# Altium PCB Base.PcbDoc
Units mil, origin at the board's own origin, x right, y up, seen from the top; angles counter-clockwise.
Board outline 2790.03 x 2970.03 mil, 2 copper layers (Top Layer, Bottom Layer); 89 components, 74 nets, 301 pads, 22 vias.
Unrouted connection lines stored in the file: 1.
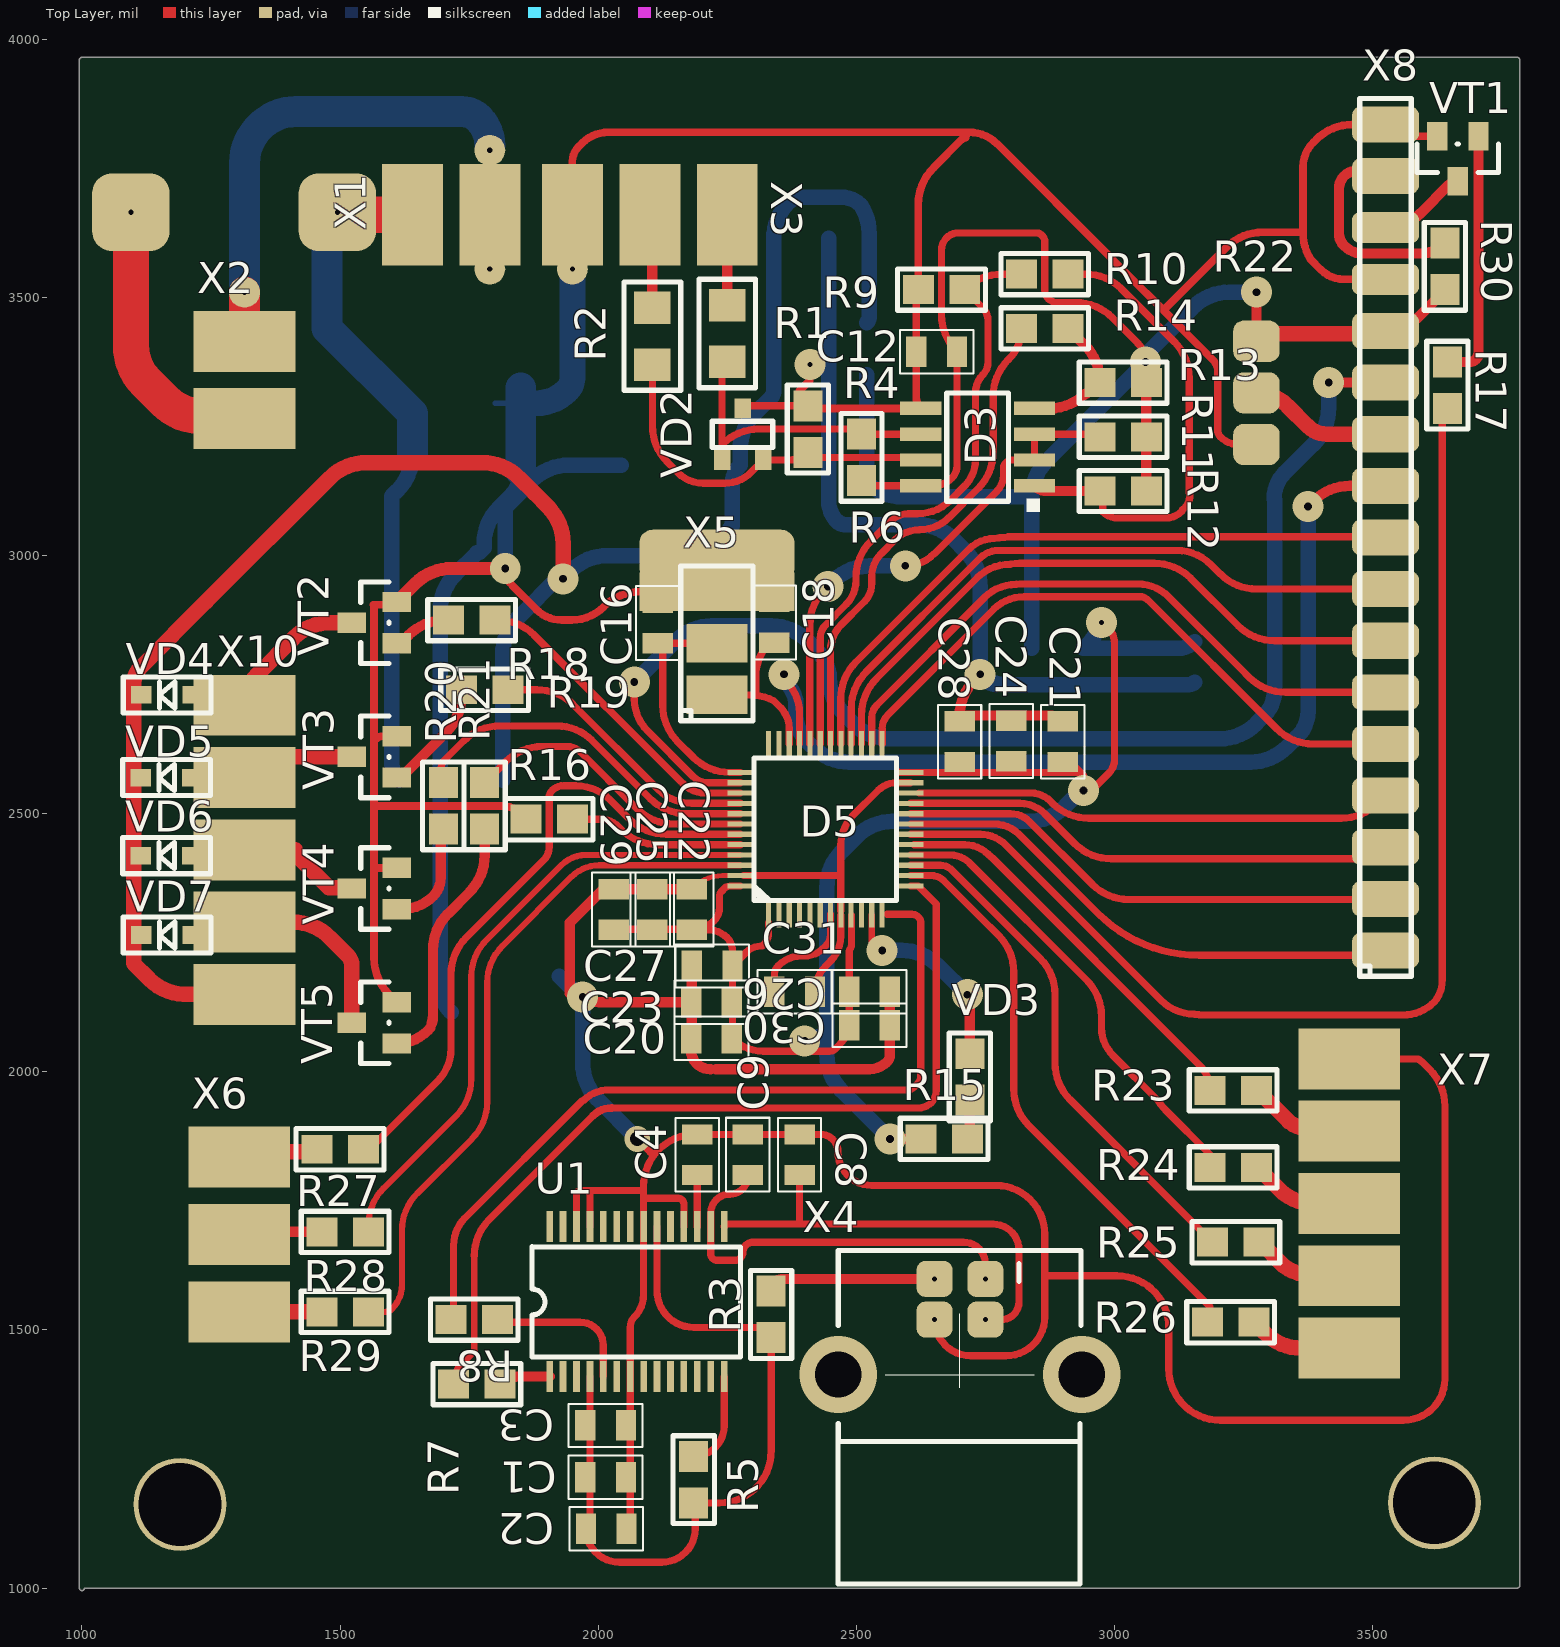
[diagram p0: Top Layer view]
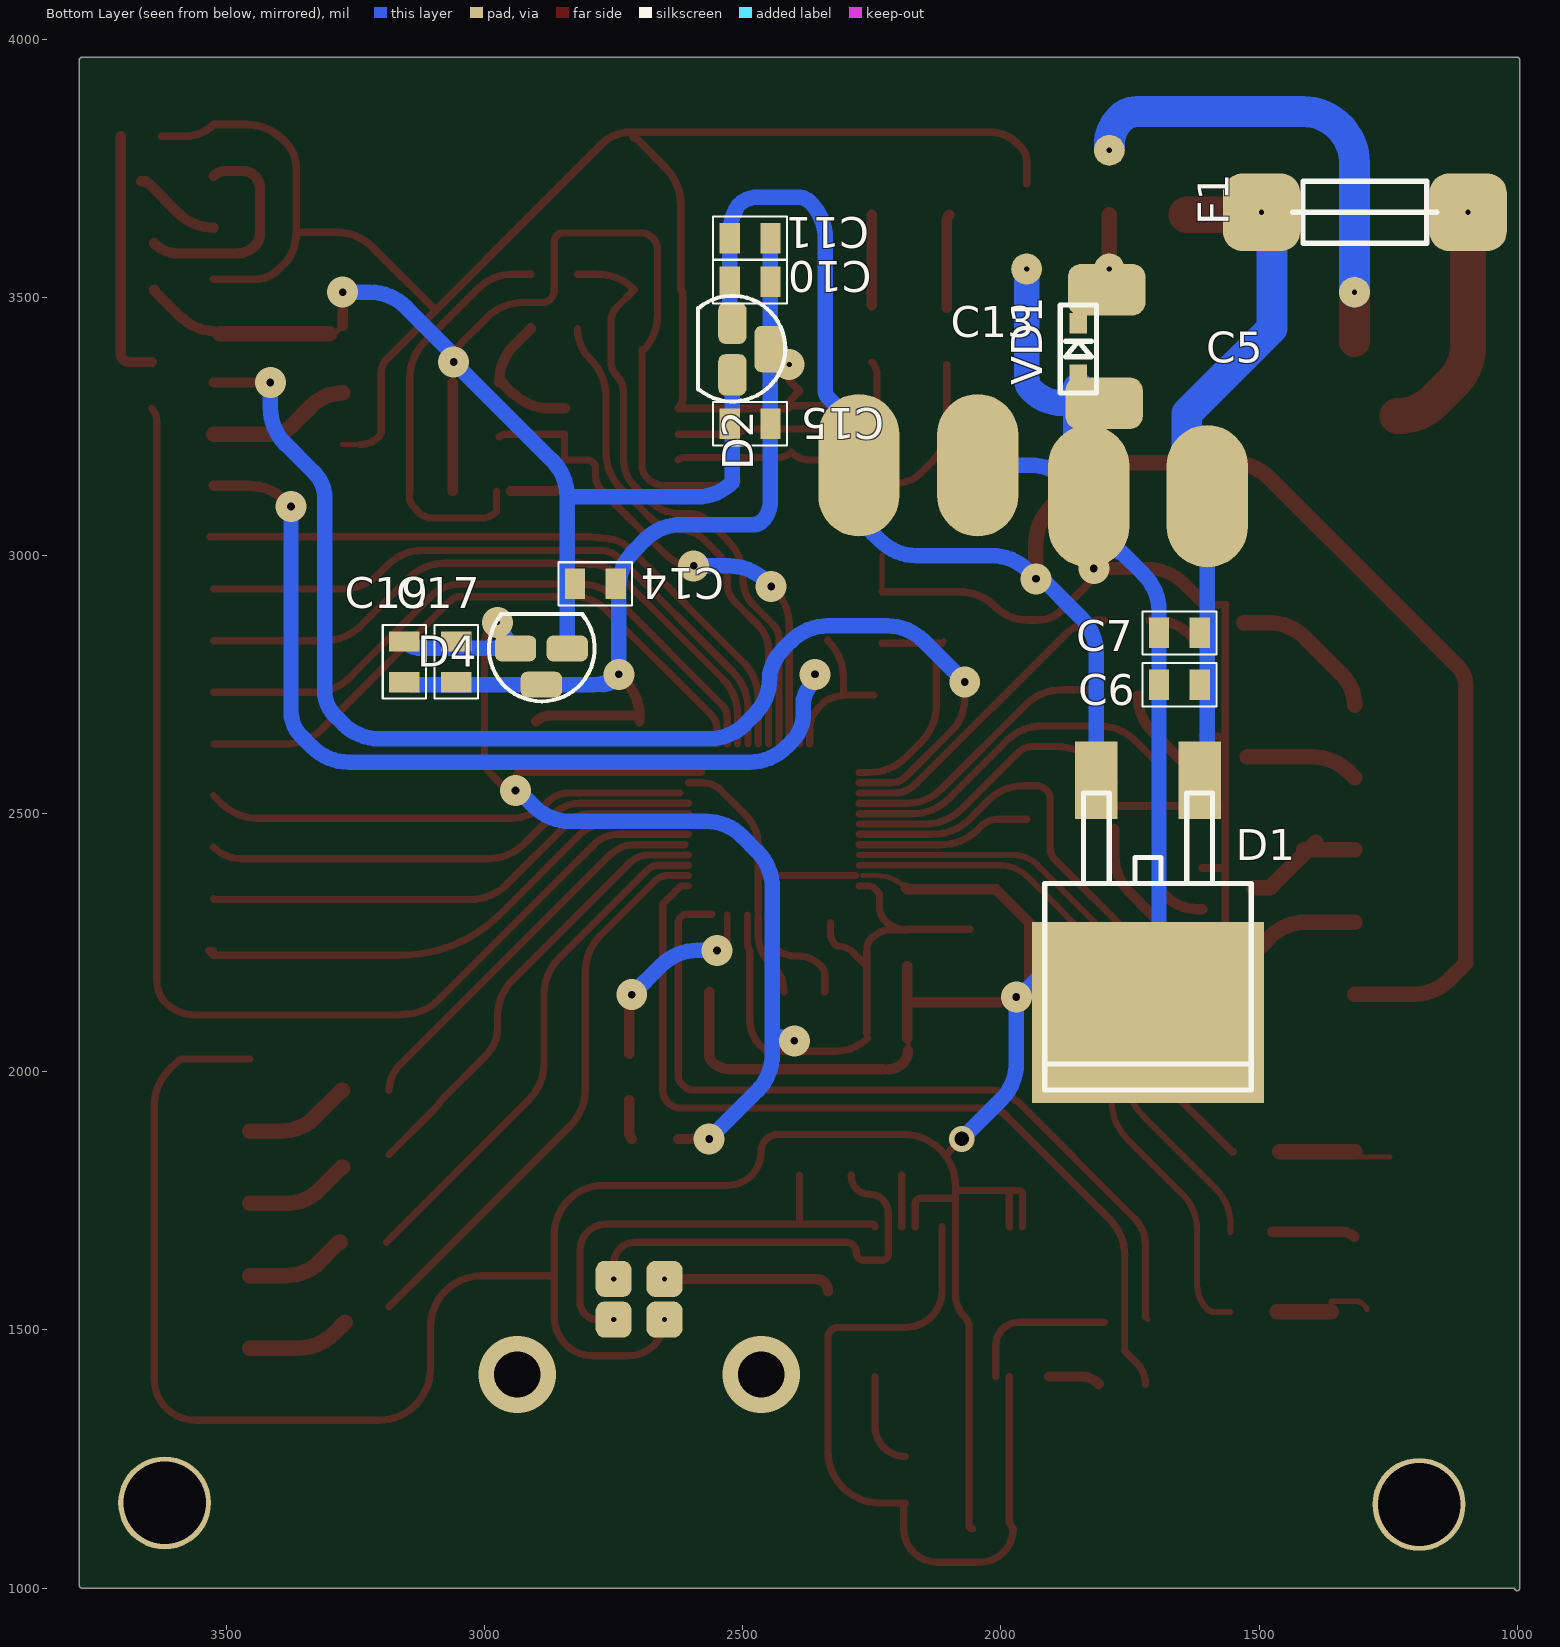
[diagram p1: Bottom Layer view, seen from below]

## Layer stack, top to bottom
Top Solder: solder mask 0.4, Solder Resist, Dk 3.5
Top Layer: signal copper 1.4
Dielectric 1: dielectric 12.6, FR-4, Dk 4.8
Bottom Layer: signal copper 1.4
Bottom Solder: solder mask 0.4, Solder Resist, Dk 3.5

## Board outline
994.99,1000 994.99,3960 cw(c1000,3960) 1000,3965.01 3780,3965.01 cw(c3780,3960) 3785.01,3960 3785.01,1005 cw(c3780,1005) 3780,999.99 1005.01,999.99 cw(c1000,1000)

## Design rules (kind name [scope] priority, off if disabled: settings)
Clearance [All] p1: gap=10 ignorepadtopadclearanceinfootprint=FALSE except(0: Arc-Hole Track-Hole SMDPad-Hole THPad-Hole Via-Hole Fill-Hole Poly-Hole Region-Hole Text-Hole)
PolygonConnect [All] p1: connectstyle=Relief reliefconductorwidth=10 reliefentries=4 polygonreliefangle="90 Angle" airgapwidth=10
RoutingVias [All] p1: holewidth=28 width=50 viastyle="Through Hole" minholewidth=28 minwidth=50 maxholewidth=28 maxwidth=50
SolderMaskExpansion [All] p1: expansion=4
Width [All] p1: maxlimit=10 minlimit=10 preferedwidth=10
30 further rules are at their usual default settings.

## Components (designator, comment, footprint, x,y, rotation, side; value= is the part's Value field where it differs from the comment)
C1 "CC0805" 0805T 2053.74,1215 r180 top value="10 нФ"
C2 "CC0805" 0805T 2055,1115 r180 top value="4,7 мкФ"
C3 "CC0805" 0805T 2053.74,1315 r180 top value="100 нФ"
C4 "CC0805" 0805T 2192,1878.74 r270 top value="100 нФ"
C5 "C-RAD-2_5-6_8" C_electrolit_smd_7mm 1580,3115 r0 bottom value={Value}
C6 "CC0805" 0805T 1693.74,2750 r180 bottom value=106
C7 "CC0805" 0805T 1693.74,2850 r180 bottom value=104
C8 "CC0805" 0805T 2390,1878.74 r270 top value="10 пФ"
C9 "CC0805" 0805T 2290,1800 r90 top value="0.1 пФ"
C10 "CC0805" 0805T 2446.26,3530 r0 bottom value=106
C11 "CC0805" 0805T 2446.26,3615 r0 bottom value=104
C12 "CC0805" 0805T 2616.26,3395 r0 top value=104
C13 "C-RAD-2_5-6_8" C_electrolit_smd_7mm 2295,3175 r180 bottom value={Value}
C14 "CC0805" 0805T 2746.26,2945 r0 bottom value=106
C15 "CC0805" 0805T 2446.26,3255 r0 bottom value=104
C16 "CC0805" 0805T 2115,2908.74 r270 top value=27p
C17 "CC0805" 0805T 3055,2754.75 r90 bottom value=104
C18 "CC0805" 0805T 2341.26,2910 r270 top value=27p
C19 "CC0805" 0805T 3155.27,2754.75 r90 bottom value=104
C20 "CC0805" 0805T 2180,2065 r0 top value=475
C21 "CC0805" 0805T 2900,2678.82 r270 top value=475
C22 "CC0805" 0805T 2181.34,2353.74 r270 top value=475
C23 "CC0805" 0805T 2180,2135 r0 top value=104
C24 "CC0805" 0805T 2800,2680 r270 top value=104
C25 "CC0805" 0805T 2105,2353.74 r270 top value=104
C26 "CC0805" 0805T 2565,2155 r180 top value=105
C27 "CC0805" 0805T 2181.26,2205 r0 top value=104
C28 "CC0805" 0805T 2700,2678.74 r270 top value=104
C29 "CC0805" 0805T 2030,2353.74 r270 top value=104
C30 "CC0805" 0805T 2565,2090 r180 top value=103
C31 "CC0805" 0805T 2420,2155 r180 top value=104
D1 "L78-D2PAK" D2PAK(IR) 1615,2565 r0 bottom value={Value}
D2 "L78-D2PAK" TO92-LM_TL431_TO93(Primary)#1 2520,3450 r270 bottom value=L7805
D3 "ST485D" SO8 2845,3135 r180 top
D4 "L78-D2PAK" TO92-LM_TL431_TO93(Primary)#2 2840,2820 r0 bottom value=L7805
D5 "STM32F030C8T6" LQFP48 2330,2305 r90 top
F1 "F" F 1095,3665 r0 bottom value={Value}
R1 "201" RC1206_IPC 2250,3430 r90 top value="1206    201"
R2 "201" RC1206_IPC 2105,3425 r90 top value="1206    201"
R3 "R0805MY" RC0805 2335,1575 r270 top value="1 Ом"
R4 "R0805MY" RC0805 2406.26,3290 r270 top value=10K
R5 "R0805MY" RC0805 2185,1165 r90 top value="10 КОм"
R6 "R0805MY" RC0805 2510,3235 r270 top value=10K
R7 "R0805MY" RC0805 1720,1395 r0 top value="5,1 кОм"
R8 "R0805MY" RC0805 1715,1520 r0 top value="1 кОм"
R9 "R0805MY" RC0805 2620,3515 r0 top value=33K
R10 "R0805MY" RC0805 2820,3545 r0 top value="20 K"
R11 "R0805MY" RC0805 3061.72,3230 r180 top value=10K
R12 "R0805MY" RC0805 3061.72,3125 r180 top value=10K
R13 "R0805MY" RC0805 3061.72,3335 r180 top value=10K
R14 "R0805MY" RC0805 2820,3440 r0 top value="1 K"
R15 "RC0805" RC0805 2625,1870 r0 top value=510
R16 "R0805MY" RC0805 1950,2489.29 r180 top value=10K
R17 "R0805MY" RC0805 3645,3375 r270 top value=100
R18 "R0805MY" RC0805 1710,2875 r0 top value=100
R19 "R0805MY" RC0805 1735,2740 r0 top value=100
R20 "R0805MY" RC0805 1700,2470 r90 top value=100
R21 "R0805MY" RC0805 1780,2470 r90 top value=100
R22 "3362R" "Resistor 3363R" 3255,3315 r270 top value={Value}
R23 "R0805MY" RC0805 3275,1964.14 r180 top value="1 K"
R24 "R0805MY" RC0805 3275,1815 r180 top value="1 K"
R25 "R0805MY" RC0805 3280,1670 r180 top value="1 K"
R26 "R0805MY" RC0805 3270,1515 r180 top value="1 K"
R27 "R0805MY" RC0805 1455,1850 r0 top value="1 K"
R28 "R0805MY" RC0805 1465,1690 r0 top value="1 K"
R29 "R0805MY" RC0805 1465,1535 r0 top value="1 K"
R30 "R0805MY" RC0805 3640,3605 r270 top value=100
U1 "FT232RL" SSOP_R28 1906,1410 r90 top
VD1 "DIOD_SOD232" 1N4148_LRG 1850,3350 r90 bottom
VD2 "CDSOT23-SM712" SOT-23A 2240,3185 r0 top
VD3 "KP-2012SURK" RC0805 2720,1945 r90 top
VD4 "DIOD_SOD232" 1N4148_LRG 1215,2730 r180 top
VD5 "DIOD_SOD232" 1N4148_LRG 1214.14,2570 r180 top
VD6 "DIOD_SOD232" 1N4148_LRG 1214.14,2418.71 r180 top
VD7 "DIOD_SOD232" 1N4148_LRG 1215,2265 r180 top
VT1 "IRLML2803" SOT-23_IPC 3705,3812 r180 top
VT2 "IRLML2803" SOT-23_IPC 1610,2830 r90 top
VT3 "IRLML2803" SOT-23_IPC 1610,2570 r90 top
VT4 "IRLML2803" SOT-23_IPC 1610,2315 r90 top
VT5 "IRLML2803" SOT-23_IPC 1610,2055 r90 top
X1 "TB08-210" DG___3_5_____2P 1640,3660 r0 top
X2 "TB08-210" DG___3_5_____2P 1315,3265 r90 top
X3 "DG300-7.5-3P" DG__3_5____3P 2250,3660 r180 top
X4 "USB_TYPE_B" TSB4BR 2750,1598.74 r90 top
X5 "PLS-3" PLS-3_smd 2230,2730 r90 top
X6 "DG300-7.5-3P" DG__3_5____3P 1305,1835 r270 top
X7 "CONN_5" DG_3_5____5P 3465,1605 r90 top
X8 "PLS_17" PLS_17 3525,2235 r90 top
X10 "CONN_5" DG_3_5____5P 1305,2570 r270 top

## Footprints (in the part's own frame and the unit in brackets; to place one, negate y for a bottom-side part, rotate by r counter-clockwise, add the part's x,y. Pads: shape width x height; smd on the part's side, far side on the other; paste and mask are expansions set on the pad)
1N4148_LRG [mil]
  rect 40x34 smd: 1(0,0) 2(100,0)
  silkscreen extent -35,-35 135,35
0805T [mm]
  rect 1x1.5 smd: 1(0,0) 2(2,0)
  silkscreen extent -0.81,-1.07 2.82,1.07
C_electrolit_smd_7mm [mm]
  oval 4x7 smd: 1(0.508,0) 2(6.35,0)
D2PAK(IR) [mil]
  rect 82x150 smd: 1(0,0) 3(200,0)
  rect 450x350 smd: 2(100,450)
  silkscreen extent -100,25 300,600
DG_3_5____5P [mm]
  rect 3x5 smd: 1(-3.556,0.254) 2(0,0.254) 3(3.556,0.254) 4(7.112,0.254) 5(10.668,0.254)
DG__3_5____3P [mm]
  rect 3x5 smd: 1(0,0) 2(3.81,0) 3(7.62,0)
DG___3_5_____2P [mm]
  rect 3x5 smd: 1(0,0) 2(3.81,0)
F [mil]
  rrect50% 150x150 hole 10: 1(0,0) 2(400,0)
  silkscreen extent 60,-60 340,60
LQFP48 [mil]
  rect 50x10 smd: 1(0,0) 2(0,-20) 3(0,-40) 4(0,-60) 5(0,-80) 6(0,-100) 7(0,-120) 8(0,-140) 9(0,-160) 10(0,-180) 11(0,-200) 12(0,-220) 25(330,-220) 26(330,-200) 27(330,-180) 28(330,-160) 29(330,-140) 30(330,-120) 31(330,-100) 32(330,-80) 33(330,-60) 34(330,-40) 35(330,-20) 36(330,0)
  rect 10x50 smd: 13(55,-275) 14(75,-275) 15(95,-275) 16(115,-275) 17(135,-275) 18(155,-275) 19(175,-275) 20(195,-275) 21(215,-275) 22(235,-275) 23(255,-275) 24(275,-275) 37(275,55) 38(255,55) 39(235,55) 40(215,55) 41(195,55) 42(175,55) 43(155,55) 44(135,55) 45(115,55) 46(95,55) 47(75,55) 48(55,55)
  silkscreen extent 27,-248 303,28
PLS-3_smd [mm]
  rect 1.9x3 smd: 1(0,0) 2(2.54,0)
  rect 1.9x7.62 smd: 3(5.08,0)
  silkscreen extent -1.27,-1.78 6.35,1.78
PLS_17 [mil]
  rrect50% 70x130 smd: 1(0,0) 2(100,0) 3(200,0) 4(300,0) 5(400,0) 6(500,0) 7(600,0) 8(700,0) 9(800,0) 10(900,0) 11(1000,0) 12(1100,0) 13(1200,0) 16(1500,0) 17(1600,0)
  rrect50% 60x130 smd: 14(1300,0) 15(1400,0)
  silkscreen extent -50,-50 1650,50
RC0805 [mil]
  rect 60x56 smd: 1(0,0) 2(90,0)
  silkscreen extent -40,-40 130,40
RC1206_IPC [mm]
  rect 1.6x1.8 smd: 1(-1.397,0) 2(1.397,0)
  silkscreen extent -2.67,-1.4 2.67,1.4
"Resistor 3363R" [mil]
  rrect50% 80x90 smd: 1(-100,20) 2(0,20) 3(100,20)
SO8 [mil]
  rect 80x26 smd: 1(0,0) 2(0,-50) 3(0,-100) 4(0,-150) 5(220,-150) 6(220,-100) 7(220,-50) 8(220,0)
  silkscreen extent -10,-180 170,50
SOT-23_IPC [mm]
  rect 1x1.4 smd: 1(0,0) 2(2.032,0) 3(1.016,2.21)
  silkscreen extent -0.99,0.38 3.02,1.78
SOT-23A [mil]
  rect 32x38 smd: 1(0,0) 2(80,0) 3(40,100)
  silkscreen extent -19,24 98,75
SSOP_R28 [mil]
  rect 60x13 smd: 1(0,0) 2(0,-26) 3(0,-52) 4(0,-78) 5(0,-104) 6(0,-130) 7(0,-156) 8(0,-182) 9(0,-208) 10(0,-234) 11(0,-260) 12(0,-286) 13(0,-312) 14(0,-338) 15(290,-338) 16(290,-312) 17(290,-286) 18(290,-260) 19(290,-234) 20(290,-208) 21(290,-182) 22(290,-156) 23(290,-130) 24(290,-104) 25(290,-78) 26(290,-52) 27(290,-26) 28(290,0)
  silkscreen extent 38,-370 251,34
TO92-LM_TL431_TO93(Primary)#1 [mil]
  rrect50% 80x55 smd: 1(0,0) 3(100,0)
  rrect50% 90x55 smd: 2(50,70)
  silkscreen extent -53,-67 151,102
TO92-LM_TL431_TO93(Primary)#2 [mil]
  rrect50% 80x50 smd: 1(0,0) 2(50,70) 3(100,0)
  silkscreen extent -53,-67 151,102
TSB4BR [mil]
  rrect50% 70x70 hole 10: 1(0,98.43) 2(0,0) 3(-78.74,0) 4(-78.74,98.43)
  silkscreen extent -591,-185 55,285

## Part data
D5: "ARM Cortex-M0 32-bit MCU, 64 KB Flash, 8 KB Internal RAM, 39 I/Os, 48-pin LQFP, -40 to 85 degC, Tray", I/Os (High Current)=39, Operating Frequency(F) (Processor speed) (MHz)=48, Supplier Part Number 1=497-14043-ND, Supply Voltage(Vcc) min (V)=2.4, ComponentLink1Description="Manufacturer URL", ComponentLink1URL=http://www.st.com/web/en/home.html, ComponentLink2Description=Datasheet, ComponentLink2URL=http://www.st.com/st-web-ui/static/active/en/resource/technical/document/datasheet/DM00088500.pdf, ComponentLink3Description="Package Specification", ComponentLink3URL=http://www.st.com/st-web-ui/static/active/en/resource/technical/document/datasheet/DM00058181.pdf, Core="ARM Cortex-M0", DatasheetVersion="Rev. 1", FLASH Size (Prog) (kB)=64, Internal RAM Size (kB)=8, Mounting Technology="Surface Mount", PackageDescription="48-Pin Low Profile Quad Flat Package, 7 x 7 mm Body, 0.5 mm Pitch", PackageReference=LQFP48, PackageVersion="Rev. 6, 06/2013", Packing=Tray, PartNumber=STM32F030C8T6, Supplier 1=Digi-Key, Supplier 2=Newark, Supplier 3=Mouser, Supplier Part Number 2=06X3647, Supplier Part Number 3=511-STM32F030C8T6
R1: library part R0805MY
R2: library part R1206_IPC
VT1 VT2 VT3 VT4 VT5: "N-Channel Enhancement-Mode MOSFET (TMOS)"
X4: "Розетка"

## Free pads (board coordinates)
  round 60 hole 10: 41(1950,3555) 42(1315,3510) 42(1790,3555) 42(1790,3785)
  rrect50% 150x100 smd far side: 46(1795,3515) 46(1800,3295)
  rrect50% 300x100 smd: 46(2230,3000)
  round 180 hole 160: 47(3619.76,1165) 48(1190,1162)

## Via types
v1: diameter 60, hole 15, Top Layer to Bottom Layer, 17 vias
v2: diameter 60, hole 10, Top Layer to Bottom Layer, 2 vias
v3: diameter 150, hole 90, Top Layer to Bottom Layer, 2 vias
v4: diameter 50, hole 28, Top Layer to Bottom Layer, 1 vias

## Nets (pads, with @x,y where several pads share a name; then routed paths per layer and width w, separated by ;. In a path a pad name is that pad's centre, name@x,y a point inside that pad or via, vN(x,y) a via of type N, cw(c..) or ccw(c..) an arc to the next point about the centre after c; other vN are vias at no path point)
GND: C1.1 C2.1 C3.1 C4.1 C5.2 C6.1 C7.1 C8.1 C9.2 C10.1 C11.1 C12.1 C13.2 C14.1 C15.1 C16.1 C17.1 C18.1 C19.1 C20.1 C21.1 C22.1 C23.1 C24.1 C25.1 C26.1 C27.1 C28.1 C29.1 C30.1 C31.1 D1.2 D2.2 D3.5 D4.2 D5.8 D5.23 D5.47 pad.41 pad.46@1800,3295 pad.46@2230,3000 pad.47 R4.1 R9.1 R16.2 R22.3 U1.7 U1.18 U1.21 U1.25 U1.26 VD1.1 VD2.3 VT1.2 VT2.2 VT3.2 VT4.2 VT5.2 X3.3 X4.4 X5.3 X7.5 X8.14 X8.17 | length 16368.8
  Top Layer w10: 2100.86,1844.85 ccw(c2109.85,1853.85) 2109.85,1841.13 ; C20.1@2180,2040.56 C20.1 ; C22.1@2184.09,2356.5 cw(c2240.83,2299.76) 2240.83,2380 D5.47@2268.36,2380 ; 2217.57,2005 2228.21,2005 ; X5.3 pad.46@2230,3000 ; 2559.14,2019.14 2560,2020 ; R22.3@3241.21,3215 R22.3
  Top Layer w14: U1.26 1958,1763 cw(c1965,1763) 1965,1770 1985,1770 ; U1.25 1984,1769 cw(c1985,1769) 1985,1770 ; C2.1 ccw(c2055,1122) 2062,1122 U1.7 2062,1505.69 cw(c2089.31,1505.69) 2070,1525 ccw(c2026.54,1568.46) 2088,1568.46 U1.21 2088,1755 ; U1.18 2166,1744 ccw(c2155,1744) 2155,1755 2088,1755 ; D5.47@2281.64,2380 2470,2380 ; C31.1 cw(c2490.91,2155) 2440.77,2205.14 2450,2214.37 ccw(c2401.72,2262.66) 2470,2262.66 D5.8@2470,2303.25 ; D5.8@2470,2311.64 2470,2380 ; D5.23 2578.3,2560 ccw(c2578.3,2508.79) 2542.1,2545.01 2494.29,2497.2 ccw(c2552.93,2438.56) 2470,2438.56 2470,2380 ; X4.4 ccw(c2721.57,1520) 2721.57,1450 2790,1450 ccw(c2790,1525) 2865,1525 2865,1605 ; 3189.64,3380.36 cw(c3164.64,3355.36) 3200,3355.36 3200,3242.07 ccw(c3217.07,3242.07) 3205,3230 ccw(c3241.21,3266.21) R22.3@3241.21,3215 ; X7.5 3582.93,2025 cw(c3582.93,2007.93) 3595,2020 3610.71,2004.29 cw(c3540,1933.58) 3640,1933.58 3640,1405 cw(c3560,1405) 3560,1325 3205,1325 cw(c3205,1425) 3105,1425 3105,1505 ccw(c3005,1505) 3005,1605 2865,1605 ; 1985,1770 2083,1770 cw(c2083,1765) 2088,1765 ; 2088,1755 2088,1765 ; 2088,1765 2088,1778.74 cw(c2188,1778.74) 2109.85,1841.13 cw(c2188,1778.74) 2188,1878.74 C4.1 C9.2 C8.1 2430.83,1878.74 cw(c2430.83,1845) 2464.57,1845 ccw(c2529.57,1845) 2529.57,1780 2770,1780 cw(c2770,1685) 2865,1685 2865,1605
  Top Layer w15: 1570,2645 cw(c1582.07,2632.93) 1582.07,2650 VT3.2 ; VT5.2@1593.37,2151.66 cw(c1665.56,2220.86) 1565.56,2220.86 1565.56,2390 ; VT4.2 1577.63,2395 ccw(c1577.63,2377.93) 1565.56,2390 ; VT2.2 cw(c1597.17,2922.83) 1597.17,2904.69 1565,2904.69 cw(c1563.65,2903.34) 1565.56,2903.34 1565.56,2515 ; v1(1820,2975) ccw(c1866.75,2975) 1833.72,2941.92 1880,2895.64 ccw(c1929.82,2945.46) 1929.82,2875 1948.64,2875 ccw(c1948.64,2962.78) 2010.68,2900.68 cw(c2081.42,2830) 2081.42,2930 X5.3 ; R16.2@1847.93,2501.36 ccw(c1815,2468.43) 1815,2515 1565.56,2515 ; X3.3@1950,3720 1950,3763.15 cw(c1990.67,3763.15) 1961.91,3791.91 1968.79,3798.79 cw(c2020,3747.57) 2020,3820 2718.05,3820 cw(c2718.05,3742.86) 2772.61,3797.39 2997.59,3572.41 cw(c2955,3529.64) 2997.68,3572.32 3025,3545 3095,3475 ; v4(2075.71,1870) 2100.86,1844.85 ; VD2.3 cw(c2292.07,3272.93) 2292.07,3290 R4.1 ; v2(2410,3370) 2410,3339.03 2390,3319.03 2410,3299.03 cw(c2397.23,3299.03) R4.1 ; 2710,3815 2713.58,3815 ; 2711.74,3809.51 ccw(c2711.74,3800.72) 2705.53,3806.95 2649.29,3750.71 ccw(c2720,3680) 2620,3680 R9.1 ccw(c2629.03,3505.97) 2616.26,3505.97 C12.1 2616.26,3306.1 ccw(c2646.1,3306.1) D3.5 2418.33,3285 cw(c2418.33,3302.07) R4.1 ; 3189.64,3380.36 3095,3475 ; X8.14 3445,3535 cw(c3445,3599.3) 3399.56,3553.81 3380.64,3572.73 cw(c3465,3626.42) 3365,3626.42 ; VT1.2 3580.53,3812 cw(c3580.53,3890.53) X8.17 3461.42,3835 ccw(c3461.42,3735) 3390.71,3805.71 3385,3800 ccw(c3433.28,3751.72) 3365,3752.3 3365,3626.42 ; 1565.56,2390 1565.56,2515 ; 3095,3475 3217.13,3597.13 cw(c3287.84,3526.42) 3287.84,3626.42 3365,3626.42
  Top Layer w20: v1(1970,2145) v1@1957.83,2145 ; C20.1@2180,2040.56 ccw(c2214.14,2040.56) 2190,2016.42 ccw(c2217.57,2044) 2217.57,2005 ; C20.1@2181.26,2065 C23.1@2181.26,2135 ; C27.1 C23.1@2181.26,2135 ; C22.1@2184.09,2356.5 C22.1 C25.1 C29.1 2010.12,2353.74 1945,2288.62 v1@1945,2152.44 ; 2228.21,2005 2525,2005 ccw(c2525,2053.28) 2559.14,2019.14 ; 2560,2020 ccw(c2547.93,2032.07) 2565,2032.07 C30.1 C26.1 ; C28.1 2700,2688.58 cw(c2800,2688.58) C28.1@2700.01,2690 ; v1(2740,2770) 2729.29,2759.29 ccw(c2800,2688.58) C28.1@2700.01,2690 ; C21.1 ccw(c2873.01,2651.82) 2873.01,2690 C28.1@2700.01,2690 ; v1@1945,2152.44 ccw(c2001.42,2235) v1@1957.83,2145 ; v1@1945,2152.44 1952.44,2145 v1@1957.83,2145 ; v1@1957.83,2145 ccw(c2001.42,2235) 2001.42,2135 C23.1 C23.1@2181.26,2135
  Top Layer w25: VT2.2 1645.71,2945.71 cw(c1716.42,2875) 1716.42,2975 v1(1820,2975)
  Bottom Layer w10: pad.46@1800,3295 1850,3295 1879.64,3295
  Bottom Layer w30: D1.2 cw(c1766.33,2166.33) 1693.74,2166.33 C6.1 C7.1 1693.74,2892.32 cw(c1793.74,2892.32) 1723.03,2963.03 1765,3005 ccw(c1765,3014.49) 1771.71,3007.78 1778.93,3015 1778.93,3022.51 cw(c1878.93,3022.51) 1808.22,3093.22 C5.2 ; v1(1820,2975) 1820,3090.86 cw(c1854.14,3090.86) C5.2@1820.08,3093.22 ; C5.2@1850,3163.28 cw(c1781.72,3163.28) C5.2 ; D1.2@1925,2185 1965,2145 v1(1970,2145) 1970,2017.13 ccw(c2070,2017.13) 1999.29,1946.42 v4(2075.71,1870) ; C13.2 1943.28,3175 ccw(c1943.28,3075) 1872.57,3145.71 C5.2@1820.08,3093.22 ; D2.2@2446.26,3396.26 C15.1 2446.26,3107.2 ccw(c2506.97,3107.2) 2464.04,3064.28 ; D2.2@2446.26,3400.86 C10.1 C11.1 ; 2465,3065 ccw(c2477.07,3077.07) 2477.07,3060 2618.58,3060 cw(c2618.58,2960) 2689.29,3030.71 2710,3010 2710.71,3009.29 cw(c2640,2938.58) 2740,2938.58 v1(2740,2770) ; 2770,2750 cw(c2770,2774.14) 2752.93,2757.07 v1(2740,2770) ; C19.1 cw(c3143.8,2766.21) 3143.8,2750 D4.2 2788.28,2750 cw(c2788.28,2818.28) v1(2740,2770) ; C5.2@1820.08,3093.22 cw(c1854.14,3090.86) C5.2
  Bottom Layer w50: 1879.64,3295 ccw(c1879.64,3380.36) 1940,3320 ccw(c1915.86,3344.14) 1950,3344.14 pad.41
  Bottom Layer w60: C5.2@1850,3163.28 1850,3295 pad.46@1850,3325
NetC1_2: C1.2 C2.2 C3.2 R3.2 R5.1 U1.4 U1.20 | length 1458.7
  Top Layer w14: U1.4 1984,1133.69 cw(c1957.57,1133.69) C2.2 ccw(c2041.26,1115) 2041.26,1050 2123,1050 ccw(c2123,1115) 2188,1115 2188,1162 ccw(c2185,1162) R5.1 2235,1165 ccw(c2235,1265) 2335,1265 R3.2 ccw(c2315,1485) 2315,1505 2185,1505 cw(c2185,1576) 2114,1576 U1.20
NetC4_2: C4.2 U1.17 | length 100
  Top Layer w14: U1.17 C4.2
NetC5_1: C5.1 C6.2 C7.2 D1.1 F1.2 X1.1 | length 1344.6
  Top Layer w70: F1.2@1475,3660 X1.1
  Bottom Layer w30: D1.1 cw(c1651.21,2601.21) 1600,2601.21 C5.1 1610.71,3125.71 ccw(c1540,3196.42) C5.1@1640,3196.42
  Bottom Layer w60: F1.2@1475,3660 1475,3440 1640,3275 C5.1@1640,3196.42
NetC8_2: C8.2 U1.15 X4.3 | length 882.7
  Top Layer w14: U1.15 cw(c2249,1700) 2249,1705 2390,1705 ; C8.2 2390,1705 ; X4.3 2780.86,1520 ccw(c2780.86,1554.14) 2815,1554.14 2815,1655 ccw(c2765,1655) 2765,1705 2390,1705
NetC9_1: C9.1 U1.16 X4.2 | length 806
  Top Layer w14: C9.1 2290,1798 cw(c2255,1798) 2255,1763 ccw(c2255,1726) 2218,1726 U1.16 2218,1647 ccw(c2230,1647) 2230,1635 2265,1635 ccw(c2265,1650) 2280,1650 cw(c2300,1650) 2300,1670 2707.68,1670 cw(c2707.68,1627.68) 2750,1627.68 X4.2
NetC10_2: C10.2 C11.2 C13.1 D1.3 D2.1 VD4.2 VD5.2 VD6.2 VD7.2 X10.5 | length 3779.2
  Top Layer w10: 1196.36,2150.13 ccw(c1201.42,2250) 1201.42,2150
  Top Layer w30: 1196.36,2150.13 cw(c1201.42,2250) 1130.71,2179.29 1100,2210 1100,2265 1100,2288.62 1100,2410 1100,2418.71 1100,2430 1100,2562.25 1100,2570 1100,2705 1100,2730 1100,2750 cw(c1148.28,2750) 1114.14,2784.14 1240.71,2910.71 1480.71,3150.71 cw(c1551.42,3080) 1551.42,3180 1775.79,3180 cw(c1775.79,3080) 1846.5,3150.71 1876.35,3120.86 1902.71,3094.5 cw(c1832,3023.79) 1932,3023.79 v1(1932,2955) ; 1201.42,2150 X10.5
  Bottom Layer w30: D1.3 1815,2808.58 cw(c1915,2808.58) 1844.29,2879.29 v1@1926,2961 ; v1(1932,2955) 1947.71,2970.71 cw(c2018.42,2900) 2018.42,3000 2163.58,3000 ccw(c2163.58,3100) 2234.29,3029.29 2245.71,3040.71 ccw(c2175,3111.42) 2259.29,3057.61 2259.29,3137.07 cw(c2312.93,3137.07) C13.1 2275,3205 cw(c2375,3205) 2304.29,3275.71 2335,3306.42 ccw(c2322.93,3318.49) 2340,3318.49 2340,3613.58 cw(c2440,3613.58) 2369.28,3684.28 cw(c2393.43,3660.15) 2393.43,3694.29 2471.12,3694.29 cw(c2471.12,3641.69) 2508.32,3678.88 cw(c2425,3623.58) 2525,3623.58 C11.2 C10.2 2525,3462.93 cw(c2507.93,3462.93) D2.1@2520,3450.86
NetC12_2: C12.2 C14.2 C15.2 D2.3 D3.8 D4.1 R6.2 R11.1 R12.1 R13.1 R22.1 R30.2 X8.13 | length 3352.6
  Top Layer w10: R22.1@3275,3445 3282.93,3437.07 ccw(c3300,3454.14) R22.1@3300,3430 ; X8.13@3512.93,3430 ccw(c3512.93,3447.07) X8.13
  Top Layer w14: R6.2 ccw(c2534.14,3169.14) 2534.14,3135 D3.8 2648.79,3135 ccw(c2648.79,3186.21) 2685,3150 ccw(c2660.86,3174.14) 2695,3174.14 C12.2 ; C12.2@2695,3399.17 C12.2 ; v1(3060,3375) ccw(c3007.57,3375) 3059.76,3380 ccw(c3007.57,3375) 3044.64,3412.07 2996,3460.71 ccw(c2925.29,3390) 2925.29,3490 2890,3490 cw(c2890,3516.21) 2871.47,3497.68 cw(c2887.07,3513.29) 2865,3513.29 2865,3607.93 ccw(c2847.93,3607.93) 2860,3620 ccw(c2847.93,3607.93) 2847.93,3625 2697.43,3625 ccw(c2697.43,3593.28) 2675,3615.71 ccw(c2699.14,3591.57) 2665,3591.57 2665,3466.42 ccw(c2765,3466.42) 2694.29,3395.71 C12.2
  Top Layer w20: R12.1 R11.1 R13.1 ; R22.1@3275,3445 v1(3275,3510) ; X8.13 ccw(c3525,3519.5) X8.13@3582.27,3457.37 ; X8.13@3582.3,3457.4 ccw(c3575.59,3464.81) 3582.34,3457.44 cw(c3589.05,3450.02) 3586.75,3459.75 3640,3513 R30.2
  Top Layer w30: R22.1@3300,3430 X8.13@3512.93,3430
  Bottom Layer w30: D2.3 2520,3142.07 ccw(c2588.79,3210.86) 2588.79,3113.58 2840,3113.58 ; D4.1 2840,3113.58 ; v1(3275,3510) 3222.63,3510 ccw(c3222.63,3410) 3151.92,3480.71 3060,3388.79 v1(3060,3375) 2869.29,3184.29 ccw(c2940,3113.58) 2840,3113.58
NetC16_2: C16.2 D5.37 X5.2 | length 444.7
  Top Layer w10: C16.2@2110,2835 C16.2
  Top Layer w14: C16.2@2125,2812.98 2125,2709.72 ccw(c2225,2709.72) 2140,2657.04 ccw(c2225,2709.72) 2154.29,2639.01 2184.01,2609.29 ccw(c2254.72,2680) 2254.72,2580 D5.37
  Top Layer w15: C16.2 X5.2
NetC17_2: C17.2 C19.2 C20.2 C21.2 C22.2 C23.2 C24.2 C25.2 C26.2 C27.2 C28.2 C29.2 C30.2 D4.3 D5.1 D5.9 D5.24 D5.48 R15.1 | length 3502.7
  Top Layer w14: 2060,2276.26 C22.2@2181.34,2276.26 ; C20.2 ccw(c2319.1,2125.36) 2319.1,2040 2447.93,2040 ccw(c2447.93,2057.07) 2460,2045 2465.94,2050.94 ccw(c2416.87,2100) 2476.91,2065.22 ccw(c2416.87,2100) 2486.26,2100 C26.2 2486.26,2231.29 cw(c2501.51,2231.29) 2488.98,2239.98 ccw(c2480.73,2245.63) 2490.73,2245.67 D5.9@2490.73,2303.25 ; C20.2@2260,2075 C27.2 ; D5.48 2260.04,2360 ccw(c2260.04,2324.59) 2246.51,2357.31 2239.1,2349.9 ccw(c2249.01,2340) 2235,2340 2235,2317.78 cw(c2199.92,2317.78) 2224.73,2292.97 cw(c2181.34,2336.36) 2218.94,2287.87 cw(c2181.34,2336.36) C22.2 2212.79,2275 cw(c2212.79,2223.79) 2249,2260 2249,2260.71 cw(c2222.44,2234.15) 2260,2234.15 C27.2 ; D5.1@2330,2288.62 2330,2269.81 cw(c2295.86,2269.81) 2320,2245.67 2319.75,2245.43 cw(c2315,2250.18) 2315,2243.46 ccw(c2315,2203.52) 2286.76,2231.76 C27.2 ; D5.24@2580.37,2581.03 2580.37,2580 D5.24 2930,2580 ; 2887.74,2580 ccw(c2887.74,2597.34) C21.2@2900,2585.08 ; C21.2 ccw(c2924.33,2624.41) 2924.33,2590 2940,2574.33 v1(2940,2545) 2935,2540 ccw(c2935,2577.83) 2961.75,2551.08 2990,2579.33 ccw(c2965.86,2603.47) 3000,2603.47 3000,2829.39 ccw(c2948.79,2829.39) 2985.01,2865.6 2980.39,2870.21 ccw(c2968.84,2858.66) 2968.84,2875 2973.84,2870 v2(2975,2870)
  Top Layer w20: v1(2565,1870) R15.1
  Bottom Layer w30: v1(2400,2060) 2400,2055 2395.33,2050.33 cw(c2442.82,2002.85) 2442.82,2070 ; v1(2565,1870) 2472.11,1962.89 cw(c2542.82,2033.61) 2442.82,2033.6 2442.82,2070 ; v1(2940,2545) 2935,2545 2904.29,2514.29 cw(c2833.58,2585) 2833.58,2485 2570,2485 ccw(c2570,2388.43) 2501.72,2456.72 2472.11,2427.11 ccw(c2542.82,2356.39) 2442.82,2356.39 2442.82,2070 ; v2(2975,2870) 2973.84,2870 2968.84,2875 cw(c2905.68,2875) 2950.34,2830.34 D4.3 3122.7,2820 ccw(c3122.7,2866.05) C19.2
NetC18_2: C18.2 D5.34 X5.1 | length 298.3
  Top Layer w14: X5.1@2246.26,2730 2293.58,2730 cw(c2293.58,2630) 2340.39,2718.36 2353.2,2705.56 cw(c2312.64,2665) 2370,2665 D5.34 ; 2305,2735 2305,2763.37 cw(c2405,2763.37) 2333.21,2832.98 ccw(c2326.07,2839.98) C18.2@2335.28,2836.09
NetC31_2: C31.2 D5.7 | length 219.1
  Top Layer w14: C31.2 2341.26,2187.06 cw(c2367.6,2187.06) 2348.97,2205.69 cw(c2393.89,2160.77) 2393.89,2224.29 2400,2224.29 ccw(c2400,2274.58) 2435.56,2239.02 2442.14,2245.6 ccw(c2423.17,2264.57) 2450,2264.57 D5.7
NetD3_1: D3.1 R10.2 R12.2 | length 902.3
  Top Layer w14: R10.2 2945,3545 cw(c2945,3448.43) 3013.28,3516.72 3110,3420 3115.71,3414.29 cw(c3045,3343.58) 3145,3343.58 3145,3122.75 cw(c3113.71,3115.5) 3130.71,3088.25 ; R12.2@2977.11,3125 2977.11,3085 ccw(c3005.74,3111.7) 3007.11,3072.57 ; 3007.6,3072.57 3099.41,3072.57 ccw(c3099.41,3116.44) 3130.42,3085.42
  Top Layer w20: D3.1 ccw(c2869.14,3159.14) 2869.14,3125 R12.2@2950,3125
NetD3_2: D3.2 D3.3 D5.32 R11.2 | length 1018
  Top Layer w14: D5.32 2410,2865.61 cw(c2505.1,2865.61) 2437.86,2932.86 v1(2445,2940) ; v1(2595,2980) ccw(c2595,3058.78) 2650.7,3003.07 2772.29,3124.66 ccw(c2741.61,3155.34) 2785,3155.34 2785,3173.32 cw(c2810.71,3159.29) 2790,3180 cw(c2802.07,3167.93) 2802.07,3185 D3.2 D3.3 2959.64,3235 cw(c2959.64,3217.93) R11.2
  Bottom Layer w30: v1(2445,2940) 2455.71,2950.71 cw(c2526.42,2880) 2510.27,2978.69 cw(c2526.42,2880) 2526.42,2980 v1(2595,2980) v1@2606.72,2980
NetD3_4: D3.4 R13.2 R14.2 | length 270.5
  Top Layer w20: D3.4 2873.51,3285 ccw(c2873.51,3385) 2941.55,3311.72 ccw(c2934.78,3319.08) 2941.61,3311.78 ccw(c2934.88,3319.17) 2941.66,3311.83 cw(c2948.4,3304.43) 2946.72,3314.29 2964.93,3332.5 2964.93,3335 R13.2 2971.72,3336.86 ccw(c2871.72,3336.86) 2942.43,3407.57 R14.2
NetD3_6: D3.6 R1.1 R6.1 VD2.1 | length 588.5
  Top Layer w14: VD2.1 2240,3215 ; R1.1 ccw(c2274.14,3350.86) 2240,3350.86 2240,3215 ; D3.6 R6.1 ccw(c2485.86,3210.86) 2485.86,3245 2311.42,3245 ccw(c2311.42,3145) 2240.71,3215.71 2240,3215
NetD3_7: D3.7 R2.1 R4.2 VD2.2 | length 725.3
  Top Layer w14: R2.1 2105,3251.42 ccw(c2205,3251.42) 2134.29,3180.71 2155,3160 ccw(c2203.28,3208.28) 2203.28,3140 2245,3140 ccw(c2245,3212.43) 2296.21,3161.21 VD2.2 2370.05,3185 ccw(c2370.05,3236.21) R4.2 ccw(c2430.4,3224.14) 2430.4,3190 2612.93,3190 cw(c2612.93,3172.93) D3.7
NetD5_11: D5.11 VD3.2 | length 384.8
  Top Layer w12: v1@2530,2247.07 D5.11
  Top Layer w20: v1@2535,2235 v1(2550,2235) ; v1(2715,2149.29) 2715,2145 cw(c2702.93,2132.93) 2720,2132.93 VD3.2
  Bottom Layer w30: v1(2550,2235) 2587.87,2235 cw(c2587.87,2135) 2658.58,2205.71 v1(2715,2149.29)
NetD5_12: D5.12 R8.1 | length 1569.5
  Top Layer w10: R8.1 R8.1@1720,1525
  Top Layer w14: R8.1@1720,1525 1720,1663.89 cw(c1795.12,1663.89) 1742,1717 1967.96,1942.96 ; 1971.47,1944.44 cw(c2021.11,1894.8) 2021.11,1965 2598.79,1965 ccw(c2598.79,1982.07) 2610.86,1970 ; 2560,2305 2607.93,2305 cw(c2607.93,2287.93) 2620,2300 cw(c2607.93,2287.93) 2625,2287.93 2625,1990 cw(c2610.86,1990) 2620.87,1980.01 2621.72,1980 2611.72,1970
NetD5_13: D5.13 R7.1 | length 1738.9
  Top Layer w13: 1760,1459.29 1760,1643.58
  Top Layer w14: R7.1 cw(c1778.64,1395) 1737.15,1436.44 1760,1459.29 ; 1760,1643.58 cw(c1860,1643.58) 1789.29,1714.29 1840,1765 1990,1915 ; 2026.21,1930 2620.86,1930 ccw(c2620.86,1964.14) 2645,1940 ccw(c2620.86,1964.14) 2655,1964.14 2655,2325 2620,2360 D5.13
  Top Layer w15: 1990.01,1915.01 cw(c2026.21,1878.79) 2026.21,1930
NetD5_14: D5.14 R26.2 | length 1097.1
  Top Layer w14: D5.14 2645.19,2380 cw(c2645.19,2345.19) 2669.8,2369.8 2739.61,2300 2775.71,2263.9 cw(c2705,2193.19) 2775.77,2263.83 cw(c2705,2193.19) 2805,2193.19 2805,1966.42 ccw(c2905,1966.42) 2834.29,1895.71 3099.64,1630.36 3185,1545
NetD5_15: D5.15 R25.2 | length 1003.8
  Top Layer w14: D5.15 2662.57,2400 cw(c2662.57,2368.28) 2685,2390.71 2840,2235.71 2855.71,2220 cw(c2785,2149.29) 2885,2149.29 2885,2016.42 ccw(c2985,2016.42) 2914.29,1945.71 R25.2
NetD5_16: D5.16 R24.2 | length 867.4
  Top Layer w14: D5.16 2682.2,2420 cw(c2682.2,2368.01) 2718.97,2404.77 2945.71,2178.03 cw(c2875,2107.32) 2951.46,2171.76 cw(c2875,2107.32) 2973.3,2125.69 cw(c2875,2107.32) 2975,2107.32 2975,2085 ccw(c3049.6,2085) 2996.85,2032.25 3084.44,1944.66 ccw(c3170,1996.42) 3099.29,1925.71 R24.2@3185,1840
NetD5_17: D5.17 R23.2 | length 781.1
  Top Layer w14: D5.17@2611.72,2440 2709.84,2440 cw(c2709.84,2375.05) 2755.77,2420.98 cw(c2705,2356.48) 2763.04,2414.52 3164.91,2012.65 cw(c3116.4,1964.14) 3182.5,1982.5 cw(c3116.4,1964.14) R23.2
NetD5_18: D5.18 R17.2 | length 2315
  Top Layer w14: D5.18 2740.46,2460 cw(c2740.46,2391.72) 2768.96,2453.77 cw(c2740.46,2391.72) 2788.74,2440 2850,2378.74 3090.32,2138.42 ccw(c3155.27,2203.37) 3155.27,2111.52 ccw(c3172.63,2210) 3172.63,2110 3558.72,2110 ccw(c3558.72,2196.32) 3591.26,2116.37 ccw(c3558.72,2196.32) 3619.76,2135.28 ccw(c3566.72,2178.28) 3635,2178.28 3635,2290 3635,3110 3635,3260.86 cw(c3669.14,3260.86) R17.2
NetD5_19: D5.19 X8.1 | length 1034.3
  Top Layer w14: D5.19 2766.72,2480 cw(c2766.72,2411.72) 2815,2460 2968.3,2306.7 ccw(c3163.66,2502.06) 3163.66,2225.78 3525.78,2225.78 3535,2235 X8.1
NetD5_20: D5.20 X8.2 | length 982.7
  Top Layer w14: D5.20 2798.79,2500 cw(c2798.79,2448.79) 2834.99,2485.01 2956.89,2363.11 ccw(c3027.6,2433.82) 3027.6,2333.82 3522.15,2333.82 ccw(c3522.15,2337.85) X8.2
NetD5_21: D5.21 X8.3 | length 963.3
  Top Layer w14: D5.21 2816.72,2520 cw(c2816.72,2451.72) 2865,2500 2923.15,2441.85 ccw(c2993.86,2512.56) 2993.86,2412.56 3470.82,2412.56 ccw(c3470.82,2489.18) X8.3
NetD5_22: D5.22 X8.4 | length 930.8
  Top Layer w14: D5.22@2621.72,2540 2838.79,2540 cw(c2838.79,2488.79) 2874.99,2525.01 2879.41,2520.59 ccw(c2950.12,2591.3) 2950.12,2491.3 3439.88,2491.3 ccw(c3439.88,2591.3) 3510.59,2520.59 X8.4
NetD5_25: D5.25 X8.5 | length 1227.2
  Top Layer w14: D5.25 2550,2665 cw(c2586.21,2665) 2560.61,2690.61 2765.64,2895.64 cw(c2825,2836.27) 2825,2920.23 3049.34,2920.23 cw(c3049.34,2898.08) 3065,2913.74 3314.45,2664.29 ccw(c3385.16,2735) 3385.16,2635 3390,2635 X8.5
NetD5_26: D5.26 X8.6 | length 1235.4
  Top Layer w14: D5.26 2530,2686.57 cw(c2564.14,2686.57) 2540,2710.71 2747.57,2918.28 cw(c2810.11,2855.74) 2810.11,2944.18 cw(c2822.87,2845) 2822.87,2945 3045,2945 cw(c3045,2860.5) 3104.77,2920.23 3245,2780 3260.71,2764.29 ccw(c3331.42,2835) 3331.42,2735 X8.6
NetD5_27: D5.27 X8.7 | length 1261.9
  Top Layer w14: D5.27 2510,2691.28 cw(c2610,2691.28) 2539.29,2761.99 2733.85,2956.55 cw(c2798.49,2891.91) 2798.49,2983.32 cw(c2816.74,2885) 2816.74,2985 3077.24,2985 cw(c3077.24,2885) 3147.95,2955.71 3239.37,2864.29 ccw(c3310.08,2935) 3310.08,2835 X8.7
NetD5_28: D5.28 X8.8 | length 1271.2
  Top Layer w14: D5.28 2490,2703.97 cw(c2590,2703.97) 2519.29,2774.68 2739.61,2995 cw(c2775.82,2958.79) 2775.82,3010 3120,3010 cw(c3120,2915.15) 3187.07,2982.22 3205,2964.29 ccw(c3275.71,3035) 3275.71,2935 X8.8
NetD5_29: D5.29 X8.9 | length 1288.5
  Top Layer w14: D5.29 2470,2723.03 cw(c2570,2723.03) 2499.29,2793.74 2718.05,3012.5 cw(c2767.56,2962.98) 2767.56,3033.01 cw(c2787.43,2935) 2787.43,3035 ; 2794.07,3036.58 X8.9@3531.64,3036.58
NetD5_30: D5.30 R14.1 | length 967.9
  Top Layer w14: D5.30 2450,2816.72 cw(c2518.28,2816.72) 2470,2865 2515,2910 ccw(c2478.79,2946.21) 2530,2946.21 2530,2960 cw(c2591.58,2960) 2548.04,3003.55 2574.65,3030.16 cw(c2622.55,2982.26) 2622.55,3050 ccw(c2622.55,3130.96) 2679.8,3073.71 2735.71,3129.62 ccw(c2665,3200.34) 2765,3200.34 2765,3308.58 cw(c2865,3308.58) 2794.29,3379.29 2795.25,3380.25 ccw(c2735.5,3440) R14.1
NetD5_31: D5.31 R9.2 R10.1 | length 1172.5
  Top Layer w14: D5.31 2430,2840 cw(c2466.21,2840) 2440.61,2865.61 2480,2905 ccw(c2433.43,2951.57) 2499.29,2951.57 2499.29,2957.87 cw(c2599.29,2957.87) 2528.58,3028.58 2566.85,3066.85 cw(c2600.63,3033.06) 2600.63,3080.84 2618.45,3080.84 ccw(c2618.45,3171.1) 2682.28,3107.28 2710,3135 ; 2710.03,3135.03 ccw(c2659.64,3185.36) 2730.86,3185.36 2730.86,3315.86 cw(c2779.14,3315.86) 2745,3350 ccw(c2720.86,3374.14) 2755,3374.14 2755,3455 ccw(c2718.79,3455) 2744.39,3480.61 R9.2 2710.71,3515.71 cw(c2781.42,3445) 2781.42,3545 R10.1
NetD5_33: D5.33 X8.10 | length 1860.3
  Top Layer w14: v1@2365.25,2754.75 cw(c2305.5,2695) 2390,2695 D5.33
  Top Layer w20: v1(3375,3095) 3385.71,3105.71 cw(c3456.42,3035) 3456.42,3135 X8.10
  Bottom Layer w30: v1(2360,2770) 2360,2760 cw(c2299.64,2699.64) 2382.39,2720.6 2382.39,2694.09 ccw(c2458.89,2694.09) 2385.03,2674.18 ccw(c2458.89,2694.09) 2404.79,2640 2415.5,2629.29 ccw(c2486.21,2700) 2486.21,2600 3263.58,2600 ccw(c3263.58,2700) 3334.29,2629.29 3355,2650 ccw(c3306.72,2698.28) 3375,2698.28 v1(3375,3095)
NetD5_38: D5.38 X8.12 | length 2518.3
  Top Layer w14: v1(2070,2755) 2070,2722.4 ccw(c2158.25,2722.4) 2095.83,2660.02 2184.37,2571.47 ccw(c2212.07,2599.17) 2212.07,2560 D5.38
  Top Layer w20: v1(3415,3335) X8.12
  Bottom Layer w30: v1(2070,2755) 2149.37,2834.37 cw(c2220.08,2763.66) 2220.08,2863.66 2335.63,2863.66 cw(c2335.63,2763.66) 2406.34,2834.37 2420.71,2820 cw(c2350,2749.29) 2447.92,2769.57 2447.92,2762.49 ccw(c2547.92,2762.49) 2450,2742.21 ccw(c2547.92,2762.49) 2477.21,2691.78 2494.71,2674.29 ccw(c2565.42,2745) 2565.42,2645 3203.58,2645 ccw(c3203.58,2745) 3274.29,2674.29 3290,2690 ccw(c3241.72,2738.28) 3310,2738.28 3310,3108.28 ccw(c3307.57,3108.28) 3309.29,3110 cw(c3381.46,3110) 3330.43,3161.03 3391.94,3222.54 ; 3385.71,3215.71 ccw(c3315,3286.42) 3391.94,3222.54 ; v1(3415,3335) 3415,3286.42 cw(c3315,3286.42) 3391.94,3222.54
NetD5_39: D5.39 R18.2 | length 606.8
  Top Layer w14: R18.2 1805.64,2875 cw(c1805.64,2775) 1876.35,2845.71 2159.81,2562.25 2160.25,2562.25 2164.72,2557.78 ccw(c2207.65,2600.71) 2207.65,2540 D5.39
NetD5_40: D5.40 R19.2 | length 532.8
  Top Layer w14: R19.2 1881.58,2740 cw(c1881.58,2640) 1952.29,2710.71 2115.75,2547.25 ccw(c2181.34,2612.84) 2181.34,2520.09 2228.13,2520.09 2228.21,2520 D5.40
NetD5_41: D5.41 R20.2 | length 708.4
  Top Layer w14: R20.2@1695,2555 1695,2584.67 cw(c1723.75,2584.67) 1703.42,2605 1739.13,2640.71 cw(c1809.84,2570) 1809.84,2670 1920,2670 cw(c1920,2573.74) 1988.06,2641.81 2100.58,2529.29 ccw(c2171.29,2600) 2171.29,2500 D5.41
NetD5_42: D5.42 R21.2 | length 576
  Top Layer w14: R21.2 1820.71,2600.71 cw(c1891.42,2530) 1891.42,2630 1940,2630 cw(c1940,2593.79) 1965.61,2619.39 2070,2515 2075.71,2509.29 ccw(c2146.42,2580) 2146.42,2480 D5.42
NetD5_43: D5.43 R27.2 | length 1237.5
  Top Layer w14: R27.2@1550,1845 1552,1845 1688.84,1981.84 ccw(c1625.67,2045) 1715,2045 1715,2189.29 cw(c1815,2189.29) 1744.29,2260 1894.88,2410.59 ccw(c1870.5,2435) 1905,2435 1905,2530.93 cw(c1924.92,2530.93) 1910.83,2545.01 cw(c1933.16,2522.68) 1933.16,2554.26 1956.79,2554.26 cw(c1956.79,2460.23) 2023.28,2526.72 2060.71,2489.29 ccw(c2131.42,2560) 2131.42,2460 D5.43
NetD5_44: D5.44 R16.1 | length 339
  Top Layer w14: R16.1 2004.79,2489.29 cw(c2004.79,2440.5) 2039.29,2475 2045,2469.29 ccw(c2115.71,2540) 2115.71,2440 D5.44
NetD5_45: D5.45 R28.2 | length 1203.7
  Top Layer w12: R28.2 1555,1703.58 cw(c1655,1703.58) 1584.29,1774.29 1725,1915 ccw(c1654.29,1985.71) 1754.29,1985.71 1754.29,2184.51 cw(c1854.29,2184.51) 1783.58,2255.22 1928.36,2400 cw(c1976.64,2351.72) 1976.64,2420 D5.45
NetD5_46: D5.46 R29.2 | length 1345.1
  Top Layer w12: R29.2 1587.93,1535 ccw(c1587.93,1552.07) 1600.05,1540.05 cw(c1607.14,1533) 1600.09,1540.09 ccw(c1551.72,1588.28) 1620,1588.28 1620,1693.58 cw(c1720,1693.58) 1649.29,1764.29 1755.71,1870.71 ccw(c1685,1941.42) 1785,1941.42 1785,2172.75 cw(c1885,2172.75) 1814.29,2243.46 1949.2,2378.37 cw(c2001.42,2326.15) 2001.42,2400 D5.46
NetF1_1: F1.1 X2.1 | length 467.2
  Top Layer w70: F1.1 1095,3406.42 ccw(c1195,3406.42) 1124.29,3335.71 1160.71,3299.29 ccw(c1231.42,3370) X2.1@1231.42,3270
NetR1_2: R1.2 X3.1 | length 175
  Top Layer w20: R1.2 X3.1
NetR2_2: R2.2 X3.2 | length 181.3
  Top Layer w20: X3.2 cw(c2087.93,3647.93) 2105,3647.93 R2.2
NetR3_1: R3.1 X4.1 | length 330.1
  Top Layer w20: R3.1 cw(c2358.74,1575) 2358.74,1598.74 X4.1
NetR5_2: R5.2 U1.14 | length 188.7
  Top Layer w14: R5.2 ccw(c2185,1314) 2244,1314 U1.14
NetR7_2: R7.2 U1.1 | length 100
  Top Layer w20: R7.2 cw(c1846.21,1358.79) 1846.21,1410 U1.1
NetR8_2: R8.2 U1.5 | length 295.7
  Top Layer w14: R8.2@1800,1515 1965,1515 cw(c1965,1470) 2010,1470 U1.5
NetR15_2: R15.2 VD3.1 | length 76.3
  Top Layer w20: R15.2 ccw(c2702.93,1882.07) 2720,1882.07 VD3.1
NetR17_1: R17.1 VT1.1 | length 489.7
  Top Layer w20: R17.1 3687.93,3375 ccw(c3687.93,3392.07) 3700,3380 ccw(c3687.93,3392.07) 3705,3392.07 VT1.1
NetR18_1: R18.1 VT2.1 | length 107.7
  Top Layer w20: VT2.1@1617,2830 1618.03,2830 1624.72,2836.7 cw(c1703.42,2775) 1703.42,2875 R18.1
NetR19_1: R19.1 VT3.1 | length 210.3
  Top Layer w20: VT3.1 1617.87,2570 1706.27,2658.39 ccw(c1637.72,2726.94) 1734.66,2726.94 R19.1@1734.66,2728.19
NetR20_1: R20.1 VT4.1 | length 205.7
  Top Layer w20: VT4.1 1619.64,2315 ccw(c1619.64,2400.36) 1680,2340 ccw(c1643.79,2376.21) 1695,2376.21 R20.1@1695,2465
NetR21_1: R21.1 VT5.1 | length 492.1
  Top Layer w20: VT5.1 ccw(c1610,2139.1) 1669.47,2079.63 1674.88,2085.05 ccw(c1611.72,2110.98) 1680,2110.98 1680,2235.87 cw(c1780,2235.87) 1709.29,2306.58 1750.71,2348 ccw(c1680,2418.71) 1780,2418.71 R21.1
NetR22_2: R22.2 X8.11 | length 277.3
  Top Layer w30: R22.2 cw(c3275,3230.5) 3334.77,3290.23 3375,3250 ccw(c3411.21,3286.21) 3411.21,3235 X8.11
NetR23_1: R23.1 X7.4 | length 209
  Top Layer w30: R23.1 3277,1964.14 3337.7,1903.44 ccw(c3395.56,1985) 3395.56,1885 X7.4
NetR24_1: R24.1 X7.3 | length 205.2
  Top Layer w30: R24.1 3277,1815 3328.56,1763.44 ccw(c3386.42,1845) 3386.42,1745 X7.3
NetR25_1: R25.1 X7.2 | length 198.1
  Top Layer w30: R25.1 3282,1670 3328.56,1623.44 ccw(c3386.42,1705) 3386.42,1605 X7.2
NetR26_1: R26.1 X7.1 | length 201.4
  Top Layer w30: R26.1 3290.71,1494.29 ccw(c3361.42,1565) 3361.42,1465 X7.1
NetR27_1: R27.1 X6.1 | length 217.7
  Top Layer w10: X6.1@1246.42,1835 X6.1 X6.1@1315,1845
  Top Layer w30: X6.1@1315,1845 R27.1@1460,1845
NetR28_1: R28.1 X6.2 | length 162.7
  Top Layer w20: X6.2@1315,1680 cw(c1339.14,1655.86) 1339.14,1690 R28.1@1475,1690
NetR29_1: R29.1 X6.3 | length 202.2
  Top Layer w10: X6.3@1291.45,1539.75 1291.45,1542.5 1302.5,1553.55 1305.25,1553.55 1307.19,1555.49 1360.19,1555.49 X6.3@1360.19,1535
  Top Layer w30: X6.3@1360.19,1535 R29.1
NetR30_1: R30.1 X8.16 | length 430
  Top Layer w20: X8.16 ccw(c3500.86,3710.86) 3500.86,3745 3469.14,3745 ccw(c3469.14,3710.86) 3445,3735 ccw(c3469.14,3710.86) 3435,3710.86 3435,3624.14 ccw(c3469.14,3624.14) 3445,3600 ccw(c3481.21,3636.21) 3481.21,3585 3591.72,3585 ccw(c3591.72,3653.28) 3606.65,3586.65 ccw(c3591.72,3653.28) R30.1
NetVD1_2: pad.42 pad.46@1795,3515 VD1.2 X1.2 X2.2 | length 1021.4
  Top Layer w30: pad.42@1790,3555 X1.2
  Top Layer w60: X2.2 pad.42@1315,3510
  Bottom Layer w60: pad.42@1315,3510 1315,3760 cw(c1415,3760) 1415,3860 1735.5,3860 cw(c1735.5,3812.93) 1768.79,3846.21 cw(c1717.57,3795) pad.42@1790,3795
NetVD4_1: VD4.1 VT2.3 X10.1 | length 293.8
  Top Layer w30: X10.1 cw(c1399.5,2710) 1339.75,2769.75 1410.71,2840.71 cw(c1481.42,2770) 1481.42,2870 VT2.3 VT2.3@1530,2870
NetVD5_1: VD5.1 VT3.3 X10.2 | length 220.3
  Top Layer w30: X10.2 1325.71,2580.71 cw(c1396.42,2510) 1396.42,2610 VT3.3
NetVD6_1: VD6.1 VT4.3 X10.3 | length 255.2
  Top Layer w30: X10.3 X10.3@1405,2430 ; X10.3@1390,2445 X10.3@1405,2430 ; 1413.58,2430 X10.3@1405,2430 ; VT4.3@1510,2356.5 1478.5,2356.5 X10.3@1405,2430
NetVD7_1: VD7.1 VT5.3 X10.4 | length 354.8
  Top Layer w30: X10.4 1408.58,2290 cw(c1408.58,2190) 1479.29,2260.71 1515,2225 cw(c1495.69,2205.69) 1523,2205.69 VT5.3
NetVT1_3: VT1.3 X8.15 | length 180.7
  Top Layer w20: X8.15 ccw(c3525,3731.57) 3593.28,3663.28 3647.93,3717.93 cw(c3665,3700.86) VT1.3 VT1.3@3656.42,3725
pads on no net: D5.2 D5.3 D5.4 D5.5 D5.6 D5.10 D5.35 D5.36 U1.2 U1.3 U1.6 U1.8 U1.9 U1.10 U1.11 U1.12 U1.13 U1.19 U1.22 U1.23 U1.24 U1.27 U1.28
copper on no net:
  other v3: 2464.57,1413.7 2937.01,1413.7

## Silkscreen, mask and mechanical layers (free items; w line width, h text height)
Mechanical 1:
  lines w10: 7565,6240 7570,6245
  lines w20: 1005,1005 3785,1005
  lines w30: 1000,1000 1000,3960 3785,3960 3785,1005